# Altium PCB CLLC_PrimarySide_v13.PcbDoc (part 2 of 2)
Units mm, origin at the board's own origin, x right, y up, seen from the top; angles counter-clockwise.
Board outline 161.1 x 167.75 mm, 4 copper layers (GND, SIG, HVDC, GND/OUTPUT), stack 1.369 mm thick; 89 components, 34 nets, 222 pads, 484 vias.
Unrouted connection lines stored in the file: 15.
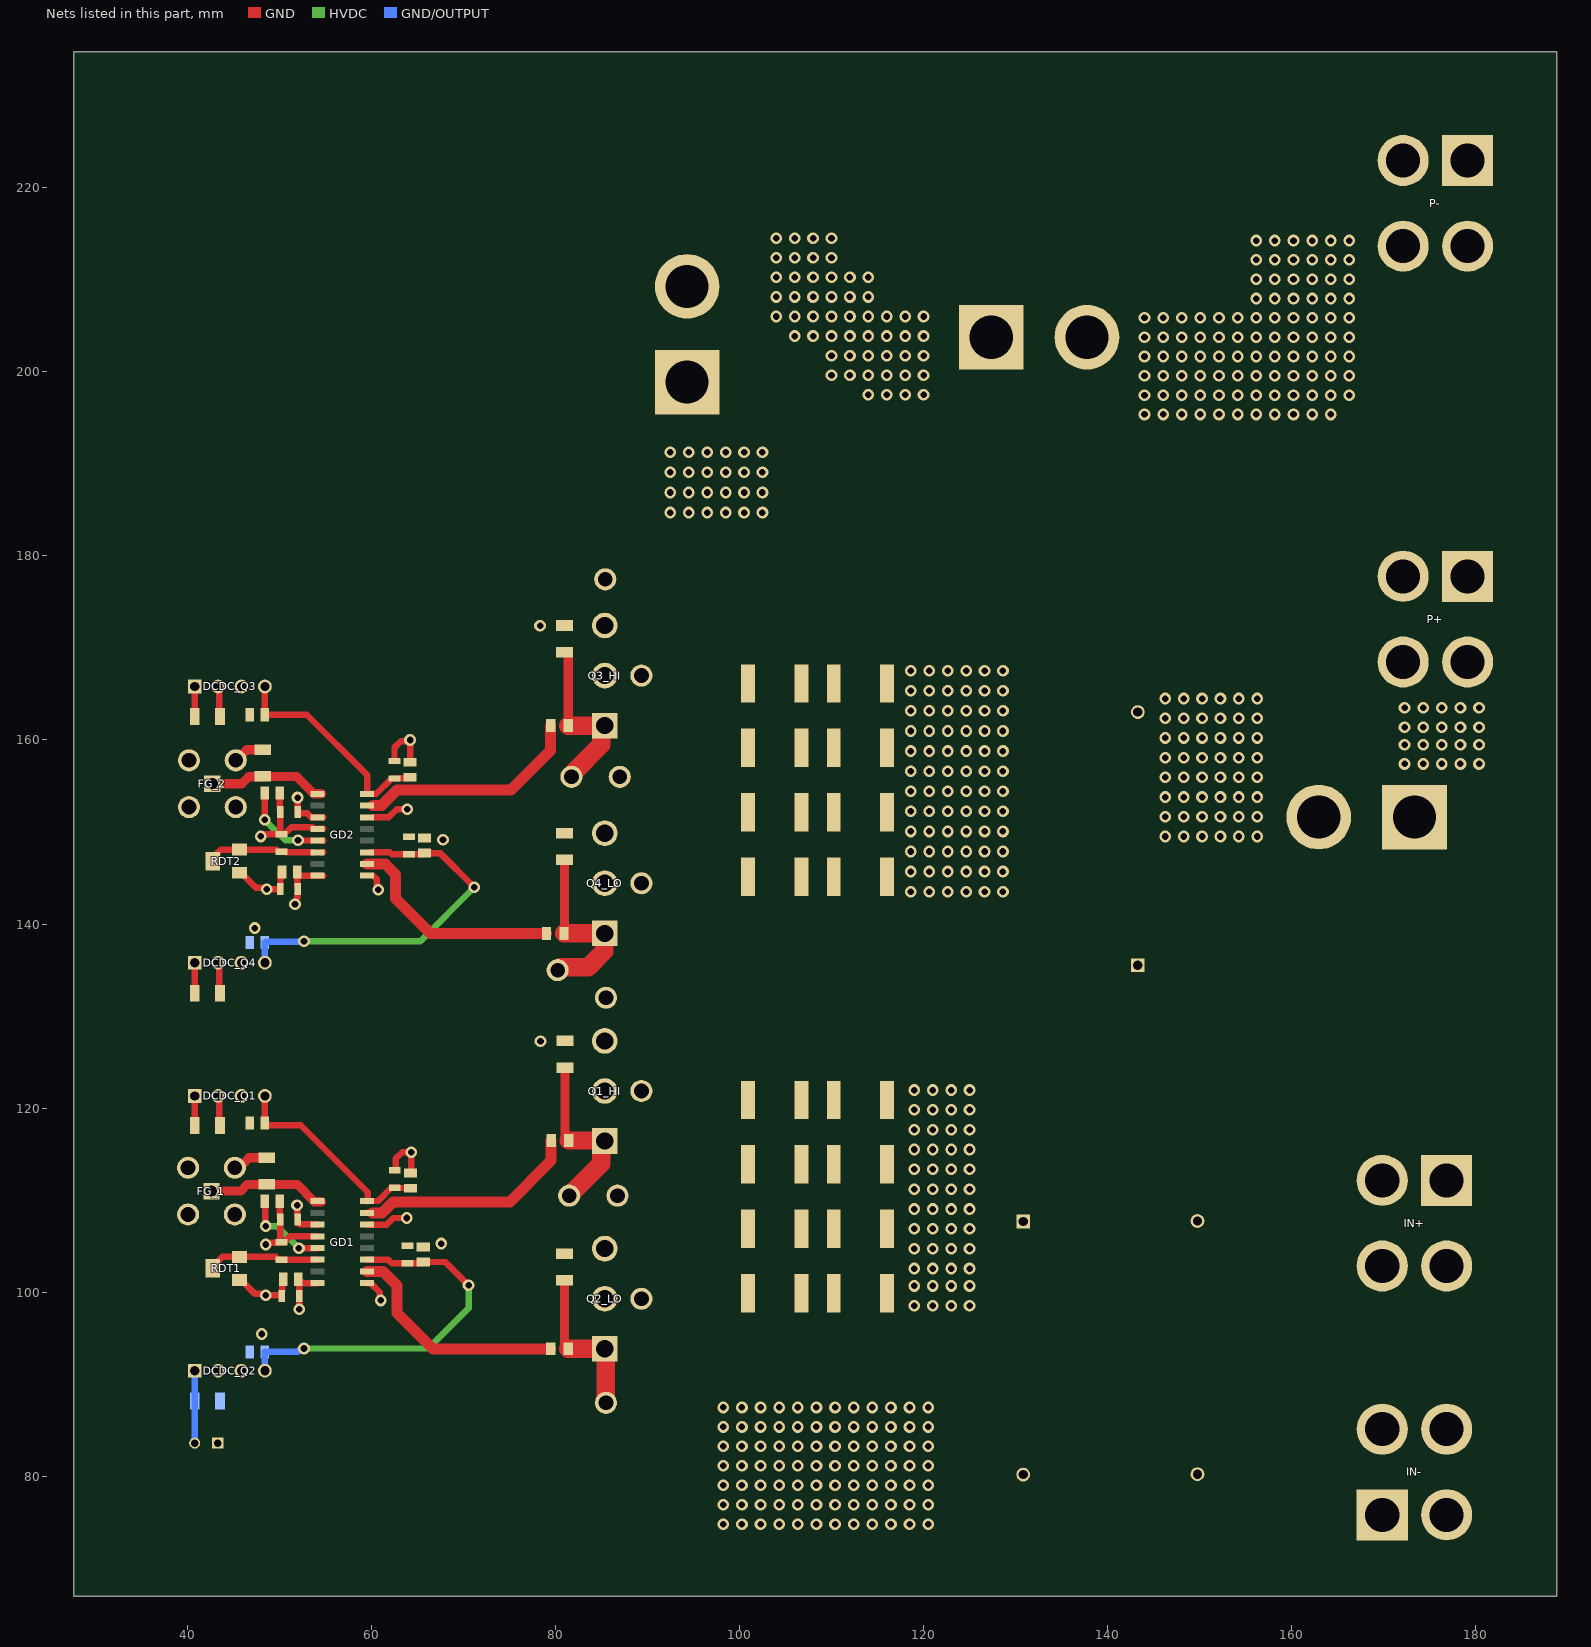
[diagram p4: the nets of this part, all layers, seen from the top]

## Via types
v1: diameter 1.27, hole 0.711, GND to GND/OUTPUT, 472 vias
v2: diameter 3, hole 3, GND to GND/OUTPUT, 8 vias
v3: diameter 4.5, hole 4.5, GND to GND/OUTPUT, 4 vias

## Nets (pads, with @x,y where several pads share a name; then routed paths per layer and width w, separated by ;. In a path a pad name is that pad's centre, name@x,y a point inside that pad or via, vN(x,y) a via of type N, cw(c..) or ccw(c..) an arc to the next point about the centre after c; other vN are vias at no path point)
NetC1_2: C1.2 C2.1
NetC3_2: C3.2 C4.1
NetC5_2: C5.2 C6.1
NetC7_2: C7.2 C8.1
NetC9_2: C9.2 C10.1
NetC11_2: C11.2 C12.1
NetC13_2: C13.2 C14.1
NetC15_2: C15.2 C16.1
NetC_r1_2: C_r1.2 Lr1.F1
  other v1: 146.25,149.518 148.25,149.518 150.25,149.518 152.25,149.518 154.25,149.518 156.25,149.518 146.25,151.659 148.25,151.659 150.25,151.659 152.25,151.659 154.25,151.659 156.25,151.659 146.25,153.799 148.25,153.799 150.25,153.799 152.25,153.799 154.25,153.799 156.25,153.799 146.25,155.939 148.25,155.939 150.25,155.939 152.25,155.939 154.25,155.939 156.25,155.939 146.25,158.079 148.25,158.079 150.25,158.079 152.25,158.079 154.25,158.079 156.25,158.079 146.25,160.22 148.25,160.22 150.25,160.22 152.25,160.22 154.25,160.22 156.25,160.22 146.25,162.36 148.25,162.36 150.25,162.36 152.25,162.36 154.25,162.36 156.25,162.36 146.25,164.5 148.25,164.5 150.25,164.5 152.25,164.5 154.25,164.5 156.25,164.5
NetCdc_Q1_in_1: Cdc_Q1_in.1 Cdc_Q2_in.1 Cdc_Q3_in.1 Cdc_Q4_in.1 Cgdi1_1_1.1 Cgdi1_1_2.1 Cgdi1_2_1.1 Cgdi1_2_2.1 Cgdi2_1_1.1 Cgdi2_1_2.1 Cgdi2_2_1.1 Cgdi2_2_2.1 DCDC_Q1.2 DCDC_Q2.2 DCDC_Q3.2 DCDC_Q4.2 GD1.3 GD1.5 GD1.8 GD2.3 GD2.5 GD2.8 VDD_DC.1 | length 49.3
  GND w0.7: DCDC_Q1.2@43.37,121.341 43.48,121.231 43.48,118.246 Cdc_Q1_in.1@43.59,118.136 ; DCDC_Q4.2@43.37,135.811 43.48,135.701 43.48,132.61 Cdc_Q4_in.1@43.59,132.5 ; DCDC_Q3.2@43.37,165.814 43.48,165.704 43.48,162.665 Cdc_Q3_in.1@43.59,162.555 ; Cgdi1_1_1.1@48.43,109.9 48.49,109.84 48.49,107.26 v1(48.55,107.2) ; Cgdi2_1_1.1@48.43,154.25 48.435,154.245 48.435,151.325 v1(48.44,151.32) ; v1(51.725,142.15) 51.834,142.259 51.834,142.662 51.95,142.778 51.95,143.245 52,143.295 52,144.1 51.977,144.123 51.977,145.622 Cgdi2_2_1.1@51.954,145.645 ; v1(51.95,109.45) 51.975,109.425 51.975,108.43 52,108.405 Cgdi1_1_2.1@52,107.9 ; Cgdi2_2_1.1@51.977,145.402 51.977,145.377 52.074,145.28 52.459,145.28 52.484,145.255 GD2.8@54.813,145.255 ; Cgdi1_1_2.1@52,107.6 52.215,107.385 54.131,107.385 GD1.3@54.156,107.36 ; v1(52,153.75) 52,153.487 52,152.705 52,152.058 53.044,152.058 53.472,151.63 54.131,151.63 GD2.3@54.156,151.605 GD2.3@54.813,151.605 ; v1@52.068,149.082 GD2.5@53.756,149.082 ; Cgdi1_2_1.1@52.07,101.429 52.173,101.326 52.173,99.844 52.182,99.835 52.182,98.157 v1(52.175,98.15) ; v1(52.15,104.8) 52.16,104.81 54.146,104.81 GD1.5@54.156,104.82 ; Cgdi1_2_1.1@52.173,101.174 52.173,101.081 52.19,101.064 52.546,101.064 52.6,101.01 GD1.8@54.156,101.01 ; GD2.5@54.556,149.065 GD2.5@54.813,149.065
  HVDC w0.7: v1(48.44,151.32) 50.66,149.1 v1(52.05,149.1) ; v1(48.55,107.2) 48.559,107.191 49.759,107.191 v1(52.15,104.8)
NetCdc_Q1_in_2: Cdc_Q1_in.2 Cdc_Q2_in.2 Cdc_Q3_in.2 Cdc_Q4_in.2 CDT1.2 CDT2.2 Cgdi1_1_1.2 Cgdi1_1_2.2 Cgdi1_2_1.2 Cgdi1_2_2.2 Cgdi2_1_1.2 Cgdi2_1_2.2 Cgdi2_2_1.2 Cgdi2_2_2.2 DCDC_Q1.1 DCDC_Q2.1 DCDC_Q3.1 DCDC_Q4.1 FG_1.2 FG_1.3 FG_1.4 FG_1.5 FG_2.2 FG_2.3 FG_2.4 FG_2.5 GD1.4 GD2.4 R_pulldown_1.2 R_pulldown_2.2 RDT1.1 RDT2.1 VDD_DC.2 | length 61
  GND w0.7: Cdc_Q1_in.2@40.83,118.136 DCDC_Q1.1@40.83,121.341 ; Cdc_Q4_in.2@40.83,132.5 DCDC_Q4.1@40.83,135.811 ; Cdc_Q3_in.2@40.83,162.555 DCDC_Q3.1@40.83,165.814 ; FG_1.5@45.19,113.54 FG_1.5@45.65,113.54 ; FG_2.5@45.29,157.79 FG_2.5@45.325,157.79 ; RDT1.1@45.7,101.364 45.85,101.364 47.386,99.828 48.268,99.828 48.396,99.7 49.897,99.7 49.933,99.664 50.29,99.664 Cgdi1_2_2.2@50.29,99.607 50.29,100.112 50.34,100.162 50.34,101.339 Cgdi1_2_1.2@50.43,101.429 ; RDT2.1@45.7,145.58 45.85,145.58 47.502,143.928 48.368,143.928 48.496,143.8 Cgdi2_2_2.2@50.1,143.8 50.1,144.305 50.15,144.355 50.15,144.87 50.194,144.914 50.194,145.525 Cgdi2_2_1.2@50.314,145.645 ; v1(48,149.525) 48.154,149.525 48.379,149.75 CDT2.2@50.25,149.75 ; v1(48.55,105.2) 48.659,105.309 49.062,105.309 49.153,105.4 CDT1.2@49.9,105.4 ; Cgdi1_1_1.2@50.07,109.9 50.085,109.885 50.085,108.215 50.1,108.2 50.1,105.45 50.55,105.45 51.19,106.09 GD1.4@54.156,106.09 ; Cgdi2_1_1.2@50.085,154.235 50.085,152.515 50.1,152.5 CDT2.2@50.1,149.75 ; CDT2.2@50.55,149.75 51.3,150.5 53.616,150.5 53.756,150.36 54.131,150.36 GD2.4@54.156,150.335 GD2.4@54.813,150.335
  GND w1: FG_2.5@45.325,157.79 46.485,158.95 R_pulldown_2.2@48.225,158.95 ; FG_1.5@45.65,113.54 46.735,114.625 R_pulldown_1.2@48.65,114.625
  GND/OUTPUT w0.7: VDD_DC.2@40.83,83.62 DCDC_Q2.1@40.83,91.491
  other v1: 48.55,99.7 48.65,143.8
NetCdc_Q1_out_1: Cdc_Q1_out.1 Cgda1_1.1 Cgda1_2.1 DCDC_Q1.4 GD1.16 | length 23.7
  GND w0.7: DCDC_Q1.4@48.45,121.341 48.45,118.141 52.359,118.141 59.61,110.89 59.61,109.925 GD1.16@59.581,109.925 ; GD1.16@59.556,109.9 GD1.16@59.581,109.925 ; Cgda1_1.1@64.257,111.32 64.242,111.335 62.872,111.335 62.857,111.35 62.175,111.35 60.75,109.925 GD1.16@59.581,109.925
NetCdc_Q2_out_1: Cdc_Q2_out.1 Cgdb1_1.1 Cgdb1_2.1 DCDC_Q2.4 GD1.11 | length 40.9
  GND w0.7: GD1.11@59.556,103.55 59.581,103.525 61.875,103.525 62.225,103.175 Cgdb1_2.1@63.95,103.175 65.53,103.175 Cgdb1_1.1@65.65,103.295 68.055,103.295 v1(70.575,100.775)
  HVDC w0.7: v1(52.7,93.9) 66.2,93.9 70.575,98.275 v1(70.575,100.775)
  GND/OUTPUT w0.7: DCDC_Q2.4@48.45,91.491 Cdc_Q2_out.1@48.45,93.525 52.005,93.525 52.271,93.791 52.591,93.791 v1(52.7,93.9)
NetCdc_Q3_out_1: Cdc_Q3_out.1 Cgda2_1.1 Cgda2_2.1 DCDC_Q3.4 GD2.16 | length 23.8
  GND w0.7: DCDC_Q3.4@48.45,165.814 Cdc_Q3_out.1@48.45,162.75 53,162.75 59.556,156.194 GD2.16@59.556,154.145 ; GD2.16@60.097,154.145 60.557,154.145 62.232,155.82 63.037,155.82 63.063,155.845 64.132,155.845 Cgda2_1.1@64.232,155.945
NetCdc_Q4_out_1: Cdc_Q4_out.1 Cgdb2_1.1 Cgdb2_2.1 DCDC_Q4.4 GD2.11 | length 40.2
  GND w0.7: GD2.11@59.956,147.795 62.027,147.795 62.232,147.59 Cgdb2_2.1@64.107,147.59 ; Cgdb2_2.1@64.407,147.59 64.417,147.6 65.687,147.6 Cgdb2_1.1@65.927,147.84 ; Cgdb2_1.1@65.807,147.72 67.48,147.72 v1(71.2,144)
  HVDC w0.7: v1(52.7,138.15) 65.35,138.15 v1(71.2,144)
  GND/OUTPUT w0.7: DCDC_Q4.4@48.45,135.811 Cdc_Q4_out.1@48.45,138.011 48.52,138.08 52.655,138.08 v1@52.725,138.15
NetCDT1_1: CDT1.1 GD1.6 RDT1.2 RDT1.3 | length 12.1
  GND w0.7: RDT1.2@42.8,102.614 42.8,102.814 43.85,103.864 49.636,103.864 49.95,103.55 GD1.6@54.156,103.55
NetCDT2_1: CDT2.1 GD2.6 RDT2.2 RDT2.3 | length 11.7
  GND w0.7: RDT2.2@42.8,147.2 42.97,147.2 43.25,147.48 43.25,147.67 43.66,148.08 49.72,148.08 49.95,147.85 CDT2.1@50.2,147.85 ; CDT2.1@50.28,147.85 50.755,147.85 50.785,147.82 GD2.6@53.756,147.82 ; GD2.6@54.556,147.795 GD2.6@54.813,147.795
NetFG_1_1: FG_1.1 GD1.1 R_pulldown_1.1 | length 13
  GND w1: FG_1.1@42.65,111 45.825,111 46.55,111.725 R_pulldown_1.1@48.65,111.725 51.956,111.725 53.831,109.85 GD1.1@54.575,109.85
NetFG_2_1: FG_2.1 GD2.1 R_pulldown_2.1 | length 12.9
  GND w0.7: R_pulldown_2.1@48.187,156.012 R_pulldown_2.1@48.225,156.05
  GND w1: FG_2.1@42.75,155.25 45.941,155.25 46.703,156.012 R_pulldown_2.1@48.187,156.012 ; R_pulldown_2.1@48.225,156.05 51.876,156.05 53.776,154.15 GD2.1@54.575,154.15
NetGD1_10: GD1.10 RgB_1.1 | length 25.2
  GND w1.2: GD1.10@59.556,102.28 61.295,102.28 62.825,100.75 62.825,97.775 66.73,93.87 RgB_1.1@79.5,93.87
NetGD1_15: GD1.15 RgA_1.1 | length 24.5
  GND w0.7: GD1.15@59.556,108.63 GD1.15@60.17,108.63
  GND w1.2: GD1.15@60.17,108.63 61.18,108.63 62.375,109.825 75.075,109.825 79.55,114.3 RgA_1.1@79.55,116.5
NetGD2_10: GD2.10 RgB_2.1 | length 24.1
  GND w1.2: GD2.10@59.556,146.525 61.525,146.525 62.65,145.4 62.65,142.8 66.456,138.994 67.744,138.994 RgB_2.1@79.05,138.994
NetGD2_15: GD2.15 RgA_2.1 | length 24.5
  GND w1.2: GD2.15@60.213,152.875 61.1,152.875 62.8,154.575 75.194,154.575 79.5,158.881 RgA_2.1@79.5,161.557
NetLr1_S1: Lr1.S1 P+.1 P+.2 P+.3 P+.4
  other v1: 172.25,157.401 174.273,157.401 176.295,157.401 178.318,157.401 180.341,157.401 172.25,159.5 174.273,159.5 176.295,159.5 178.318,159.5 180.341,159.5 172.25,161.401 174.273,161.401 176.295,161.401 178.318,161.401 180.341,161.401 172.25,163.5 174.273,163.5 176.295,163.5 178.318,163.5 180.341,163.5
NetLr2_F1: Lr2.F1 Lr3.S1
  other v1: 114,197.5 116,197.5 118,197.5 120,197.5 110,199.625 112,199.625 114,199.625 116,199.625 118,199.625 120,199.625 110,201.75 112,201.75 114,201.75 116,201.75 118,201.75 120,201.75 106,203.875 108,203.875 110,203.875 112,203.875 114,203.875 116,203.875 118,203.875 120,203.875 104,206 106,206 108,206 110,206 112,206 114,206 116,206 118,206 120,206 104,208.125 106,208.125 108,208.125 110,208.125 112,208.125 114,208.125 104,210.25 106,210.25 108,210.25 110,210.25 112,210.25 114,210.25 104,212.375 106,212.375 108,212.375 110,212.375 104,214.5 106,214.5 108,214.5 110,214.5
NetLr3_F1: Lr3.F1 P-.1 P-.2 P-.3 P-.4
  other v1: 144,195.36 146.023,195.36 148.045,195.36 150.068,195.36 152.091,195.36 154.114,195.36 156.136,195.36 158.159,195.36 160.182,195.36 162.205,195.36 164.227,195.36 144,197.459 146.023,197.459 148.045,197.459 150.068,197.459 152.091,197.459 154.114,197.459 156.136,197.459 158.159,197.459 160.182,197.459 162.205,197.459 164.227,197.459 166.25,197.459 144,199.558 146.023,199.558 148.045,199.558 150.068,199.558 152.091,199.558 154.114,199.558 156.136,199.558 158.159,199.558 160.182,199.558 162.205,199.558 164.227,199.558 166.25,199.558 144,201.657 146.023,201.657 148.045,201.657 150.068,201.657 152.091,201.657 154.114,201.657 156.136,201.657 158.159,201.657 160.182,201.657 162.205,201.657 164.227,201.657 166.25,201.657 144,203.755 146.023,203.755 148.045,203.755 150.068,203.755 152.091,203.755 154.114,203.755 156.136,203.755 158.159,203.755 160.182,203.755 162.205,203.755 164.227,203.755 166.25,203.755 144,205.854 146.023,205.854 148.045,205.854 150.068,205.854 152.091,205.854 154.114,205.854 156.136,205.854 158.159,205.854 160.182,205.854 162.205,205.854 164.227,205.854 166.25,205.854 156.136,207.953 158.159,207.953 160.182,207.953 162.205,207.953 164.227,207.953 166.25,207.953 156.136,210.052 158.159,210.052 160.182,210.052 162.205,210.052 164.227,210.052 166.25,210.052 156.136,212.151 158.159,212.151 160.182,212.151 162.205,212.151 164.227,212.151 166.25,212.151 156.136,214.25 158.159,214.25 160.182,214.25 162.205,214.25 164.227,214.25 166.25,214.25
Q1_D: C1.1 C3.1 C5.1 C7.1 C9.1 C11.1 C13.1 C15.1 C_in_1.1 C_in_2.1 IN+.1 IN+.2 IN+.3 IN+.4 Q1_D.1 Q1_HI.2 Q3_D.1 Q3_HI.2
  other v1: 119,98.547 121,98.547 123,98.547 125,98.547 119,100.7 121,100.7 123,100.7 125,100.7 119,102.586 121,102.586 123,102.586 125,102.586 119,104.74 121,104.74 123,104.74 125,104.74 119,106.893 121,106.893 123,106.893 125,106.893 119,109.047 121,109.047 123,109.047 125,109.047 119,111.2 121,111.2 123,111.2 125,111.2 119,113.365 121,113.365 123,113.365 125,113.365 119,115.518 121,115.518 123,115.518 125,115.518 119,117.672 121,117.672 123,117.672 125,117.672 119,119.825 121,119.825 123,119.825 125,119.825 119,121.978 121,121.978 123,121.978 125,121.978 118.625,143.525 120.625,143.525 122.625,143.525 124.625,143.525 126.625,143.525 128.625,143.525 118.625,145.707 120.625,145.707 122.625,145.707 124.625,145.707 126.625,145.707 128.625,145.707 118.625,147.889 120.625,147.889 122.625,147.889 124.625,147.889 126.625,147.889 128.625,147.889 118.625,150.07 120.625,150.07 122.625,150.07 124.625,150.07 126.625,150.07 128.625,150.07 118.625,152.252 120.625,152.252 122.625,152.252 124.625,152.252 126.625,152.252 128.625,152.252 118.625,154.434 120.625,154.434 122.625,154.434 124.625,154.434 126.625,154.434 128.625,154.434 118.625,156.616 120.625,156.616 122.625,156.616 124.625,156.616 126.625,156.616 128.625,156.616 118.625,158.798 120.625,158.798 122.625,158.798 124.625,158.798 126.625,158.798 128.625,158.798 118.625,160.98 120.625,160.98 122.625,160.98 124.625,160.98 126.625,160.98 128.625,160.98 118.625,163.161 120.625,163.161 122.625,163.161 124.625,163.161 126.625,163.161 128.625,163.161 118.625,165.343 120.625,165.343 122.625,165.343 124.625,165.343 126.625,165.343 128.625,165.343 118.625,167.525 120.625,167.525 122.625,167.525 124.625,167.525 126.625,167.525 128.625,167.525
Q1_G: Q1_G.1 Q1_HI.1 RgA_1.2 RgsA_1.1 | length 19.6
  GND w0.7: Q1_HI.1@85.305,116.5 Q1_HI.1@85.373,116.432
  GND w1: RgsA_1.1@81.05,124.412 81.05,117.1 81.45,116.7 RgA_1.2@81.45,116.5
  GND w2: RgA_1.2@81.45,116.5 Q1_HI.1@85.305,116.5 ; Q1_G.1@81.5,110.5 84.978,113.978 84.978,116.037 Q1_HI.1@85.373,116.432
Q1_S: C_r1.1 Cdc_Q1_out.2 Cgda1_1.2 Cgda1_2.2 DCDC_Q1.3 GD1.14 Q1_HI.3 Q1_S.1 Q2_D.1 Q2_LO.2 RgsA_1.2 | length 10.1
  GND w0.7: GD1.14@59.556,107.36 61.671,107.36 62.386,108.075 v1(63.85,108.075) ; Cgda1_2.2@62.65,113.25 62.65,114.5 63.375,115.225 v1(64.35,115.225) Cgda1_1.2@64.35,112.96
  other v1: 78.389,127.29
Q2_G: Q2_G.1 Q2_LO.1 RgB_1.2 RgsB_1.1 | length 17.5
  GND w0.7: Q2_LO.1@85.373,93.87 Q2_LO.1@85.5,93.743
  GND w1: RgsB_1.1@81,101.3 81,94.47 81.4,94.07 RgB_1.2@81.4,93.87
  GND w2: RgB_1.2@81.4,93.87 Q2_LO.1@85.373,93.87 ; Q2_G.1@85.5,88 Q2_LO.1@85.5,93.743
Q2_S: C2.2 C4.2 C6.2 C8.2 C10.2 C12.2 C14.2 C16.2 C_in_1.2 C_in_2.2 Cdc_Q2_out.2 Cdc_Q4_out.2 Cgdb1_1.2 Cgdb1_2.2 Cgdb2_1.2 Cgdb2_2.2 DCDC_Q2.3 DCDC_Q4.3 GD1.9 GD2.9 IN-.1 IN-.2 IN-.3 IN-.4 Q2_LO.3 Q2_S.1 Q4_LO.3 Q4_S.1 RgsB_1.2 RgsB_2.2 | length 4.5
  GND w0.7: GD1.9@59.556,101.01 59.931,101.01 60.941,100 60.941,99.234 v1(61.05,99.125) ; GD2.9@60.213,145.255 60.622,144.846 60.622,144.256 60.641,144.237 60.641,143.834 v1(60.75,143.725)
  other v1: 98.25,74.807 100.273,74.807 102.295,74.807 104.318,74.807 106.341,74.807 108.364,74.807 110.386,74.807 112.409,74.807 114.432,74.807 116.455,74.807 118.477,74.807 120.5,74.807 98.25,76.922 100.273,76.922 102.295,76.922 104.318,76.922 106.341,76.922 108.364,76.922 110.386,76.922 112.409,76.922 114.432,76.922 116.455,76.922 118.477,76.922 120.5,76.922 98.25,79.038 100.273,79.038 102.295,79.038 104.318,79.038 106.341,79.038 108.364,79.038 110.386,79.038 112.409,79.038 114.432,79.038 116.455,79.038 118.477,79.038 120.5,79.038 98.25,81.153 100.273,81.153 102.295,81.153 104.318,81.153 106.341,81.153 108.364,81.153 110.386,81.153 112.409,81.153 114.432,81.153 116.455,81.153 118.477,81.153 120.5,81.153 98.25,83.269 100.273,83.269 102.295,83.269 104.318,83.269 106.341,83.269 108.364,83.269 110.386,83.269 112.409,83.269 114.432,83.269 116.455,83.269 118.477,83.269 120.5,83.269 98.25,85.384 100.273,85.384 102.295,85.384 104.318,85.384 106.341,85.384 108.364,85.384 110.386,85.384 112.409,85.384 114.432,85.384 116.455,85.384 118.477,85.384 120.5,85.384 98.25,87.5 100.273,87.5 102.295,87.5 104.318,87.5 106.341,87.5 108.364,87.5 110.386,87.5 112.409,87.5 114.432,87.5 116.455,87.5 118.477,87.5 120.5,87.5 48.125,95.475 67.6,105.3 47.35,139.575 67.8,149.15
Q3_G: Q3_G.1 Q3_HI.1 RgA_2.2 RgsA_2.1 | length 19.3
  GND w0.7: RgsA_2.1@81,169.537 81.175,169.537 81.4,169.312 RgsA_2.1@81.4,169.262 ; Q3_HI.1@85.363,161.547 Q3_HI.1@85.373,161.557
  GND w1: RgA_2.2@81.4,161.557 RgsA_2.1@81.4,169.262
  GND w2: RgA_2.2@81.4,161.557 Q3_HI.1@85.373,161.557 ; Q3_G.1@81.75,156 81.75,156.108 81.95,156.308 81.95,156.45 84.978,159.478 84.978,161.162 Q3_HI.1@85.363,161.547
Q3_S: Cdc_Q3_out.2 Cgda2_1.2 Cgda2_2.2 DCDC_Q3.3 GD2.14 Lr2.S1 Q3_HI.3 Q3_S.1 Q4_D.1 Q4_LO.2 RgsA_2.2 | length 10
  GND w0.7: GD2.14@60.213,151.605 61.89,151.605 62.76,152.475 v1(63.925,152.475) ; Cgda2_2.2@62.532,157.715 62.532,159.193 63.212,159.872 63.943,159.872 64.071,160 v1(64.225,160) 64.229,159.996 64.229,157.589 Cgda2_1.2@64.232,157.585
  other v1: 78.339,172.414 92.5,184.705 94.5,184.705 96.5,184.705 98.5,184.705 100.5,184.705 102.5,184.705 92.5,186.886 94.5,186.886 96.5,186.886 98.5,186.886 100.5,186.886 102.5,186.886 92.5,189.068 94.5,189.068 96.5,189.068 98.5,189.068 100.5,189.068 102.5,189.068 92.5,191.25 94.5,191.25 96.5,191.25 98.5,191.25 100.5,191.25 102.5,191.25
Q4_G: Q4_G.1 Q4_LO.1 RgB_2.2 RgsB_2.1 | length 20.1
  GND w0.7: Q4_G.1@80.25,135 Q4_G.1@80.571,135.321 ; Q4_LO.1@85.301,138.922 Q4_LO.1@85.373,138.994
  GND w1: RgB_2.2@81,138.994 RgsB_2.1@81,146.8
  GND w2: Q4_G.1@80.571,135.321 83.571,135.321 85.301,137.051 Q4_LO.1@85.301,138.922 ; RgB_2.2@80.95,138.994 Q4_LO.1@85.373,138.994
pads on no net: GD1.2 GD1.7 GD1.12 GD1.13 GD2.2 GD2.7 GD2.12 GD2.13
copper on no net:
  other v2: 112.225,69.65 31.25,70.125 185.425,70.125 31.25,151.7 185.425,151.7 31.25,230.325 112.225,230.325 185.425,230.325
  other v3: 66.273,99.31 66.273,121.872 66.273,144.434 66.273,166.997

## Polygon pours and split planes (outlines as drawn)
Q3_S on GND/OUTPUT "GND/OUTPUT-Q3_S" (solid, pour order 193): 53.525,161.7 46.55,161.7 45.25,163 45.25,167.75 48.675,171.175 73.025,171.175 79.25,177.4 82.15,177.4 83.825,179.075 89.075,179.075 90.025,180.025 90.025,202.225 91.55,203.75 101.25,203.75 105.25,199.75 105.25,185.126 99.85,179.726 99.85,174.85 99.85,150.95 90.524,141.624 83.75,141.624 82.75,142.624 82.75,144.624 84.25,146.124 86.75,146.124 89.763,149.137 89.725,149.175 89.725,163.407 91.725,165.35 91.725,168.525 89.876,170.374 84.849,170.374 73.975,159.5 73.975,152.7 73,151.725 63.5,151.725
Q2_S on GND/OUTPUT "Q2_S_L04_P198" (solid, pour order 198): 44.9,135.32 45.3,134.92 46.375,134.92 47.25,135.795 47.25,138.595 47.85,139.195 48.5,139.195 48.975,139.67 48.975,140.495 48.825,140.645 47.2,140.645 44.9,138.345
Q1_S on GND/OUTPUT "GND/OUTPUT-Q1_S" (solid, pour order 192): 84.5,125.25 73.75,114.5 73.75,108.15 73.1,107.5 63.5,107.5 60,111 53.5,117.5 46.25,117.5 45.25,118.5 45.25,124.75 47.95,127.45 75.55,127.45 80.1,132 82.875,132 84.4,133.525 88.775,133.525 95.4,140.15 144.85,140.15 149.95,135.05 149.95,127.45 148.5,126 103.05,126 99,121.95 99,104.5 91,96.5 83.75,96.5 82.75,97.5 82.75,99.5 84.25,101 86.75,101 89.5,103.75 89.5,117.65 92,120.15 92,123.1 89.85,125.25
Q2_S on GND/OUTPUT "Q2_S_L04_P174" (solid, pour order 174): 44.9,91 45.3,90.6 46.375,90.6 47.25,91.475 47.25,94.275 47.85,94.875 48.5,94.875 48.975,95.35 48.975,96.175 48.825,96.325 47.2,96.325 44.9,94.025
NetCdc_Q1_in_1 on GND/OUTPUT "GND/OUTPUT-NetCdc_Q1_in_1" (solid, pour order 170): 42,82.5 42.5,82 44,82 44.5,82.5 44.5,95 46.5,97 52.75,97 56,100.25 56,110.75 50.25,116.5 46.25,116.5 44.625,118.125 44.625,139.445 46.18,141 52.43,141 56,144.57 56,155 50.18,160.82 46.25,160.82 44.75,162.32 44.75,166.82 44,167.57 42.5,167.57 42,167.07 42,161.57 44.25,159.32 46.75,159.32 50.75,155.32 50.75,143.32 50.18,142.75 44.43,142.75 42,140.32 42,120.337 42,117.25 44.25,115 48,115 50.75,112.25 50.75,99.5 50,98.75 44.75,98.75 42,96
NetLr2_F1 on GND/OUTPUT "NETLR2_F1_L04_P154" (solid, pour order 154): 130.975,207.25 130,208.225 130,208.25 118.25,208.25 110.25,216.25 92.75,216.25 89.75,213.25 89.75,207.75 92.25,205.25 102.772,205.25 113.022,194 129,194 130.975,195.975
NetC_r1_2 on GND/OUTPUT "NETC_R1_2_L04_P150" (solid, pour order 150): 142.603,167.103 138,162.5 138,152.75 143.5,147.25 164.5,147.25 166.9,149.65 166.9,157.1 156.897,167.103
NetLr1_S1 on GND/OUTPUT "NETLR1_S1_L04_P147" (solid, pour order 147): 169.75,154 169.75,148.125 179.125,148.125 183,152 183,181.75 179.5,185.25 166.75,185.25 160,178.5 160,169.5 169.75,159.75
NetLr3_F1 on GND/OUTPUT "NETLR3_F1_L04_P146" (solid, pour order 146): 165,227.75 152.25,215 152.25,209.75 150.5,208 136.25,208 133.75,205.5 133.75,197.75 139.25,192.25 168.25,192.25 184.25,208.25 184.25,226 181.75,228.5 165.75,228.5
NetCdc_Q1_in_2 on SIG "NETCDC_Q1_IN_2_L02_P172" (solid, pour order 172): 37.75,170.95 38.775,172 44,172 44.75,171.25 44.75,162.3 46.225,160.825 50.175,160.825 56,155 56,144.575 52.425,141 46.175,141 44.75,139.575 44.75,118 46.25,116.5 50.25,116.5 56,110.75 56,100.25 52.75,97 46.5,97 44.575,95.075 44.575,82.35 43.725,81.5 40.5,81.5 37.75,84.25
Q2_S on SIG "Q2_S_L02_P197" (solid, pour order 197): 45.25,138.75 46.75,140.25 56.25,140.25 67.25,151.25 87.125,151.25 87.95,150.425 87.95,148.424 86.85,147.324 84.299,147.324 70.999,134.024 46.226,134.024 45.25,135
Q2_S on SIG "Q2_S_L02_P173" (solid, pour order 173): 45.25,89.75 45.25,94.75 46.825,96.325 56.075,96.325 66.4,106.65 86.601,106.65 87.95,105.301 87.95,103.3 86.85,102.2 83.875,102.2 70.575,88.9 46.1,88.9
Q2_S on SIG "GND-Q2_S" (solid, pour order 179): 87.75,93 91.75,97 100.5,97 107,90.5 130.25,90.5 136.25,96.5 136.25,114.25 143.35,121.35 181.025,121.35 185.1,117.275 185.1,78.1 179,72 92.75,72 87.75,77
Q2_S on GND "GND-Q2_S" (solid, pour order 196): 63.807,150.307 64.982,150.307 65.9,151.25 81.375,151.25 82.875,152.75 83.825,153.7 83.825,154.625 86.45,157.25 89.975,157.25 91.5,158.775 91.5,165.357 92.025,165.882 92.025,168.225 91.5,168.75 91.5,175.25 94.75,178.5 102.25,178.5 104.767,175.983 104.767,97.733 112,90.5 135.25,90.5 141.25,96.5 141.25,114.25 148.35,121.35 181.175,121.35 185.15,117.375 185.15,78.15 179,72 97.75,72 91.7,78.05 91.7,96.9 92.075,97.3 92.075,100.75 92.1,100.775 90.125,102.75 90.125,102.875 89.601,102.875 89.6,102.876 80.424,102.876 78.85,104.45 63.05,104.45 62.5,105 62.5,105.375 62.9,105.775 65.525,105.775 66.4,106.65 82.474,106.65 83.45,107.626 84.75,108.925 84.75,110.475 86.7,112.425 89.55,112.425 91.95,114.825 91.95,145.575 89.525,148 82.887,148 82.875,148.012 76.363,148.012 75.875,148.5 63.647,148.5 63.226,148.922 63.226,148.927 63.235,149.735
Q3_S on GND "Q3_S_L01_P194" (solid, pour order 194): 45.15,167.3 45.15,164.575 45.175,164.575 46.3,163.45 46.3,161.925 47.375,161.925 47.375,164.975 46.725,165.625 46.725,166.9 46.225,167.4 46.225,167.425 45.275,167.425
Q1_S on GND "Q1_S_L01_P195" (solid, pour order 195): 45.15,122.827 45.15,120.102 45.175,120.102 46.3,118.977 46.3,117.452 47.275,117.452 47.275,120.602 46.725,121.152 46.725,122.427 46.225,122.927 46.225,122.952 45.275,122.952
Q3_S on GND "Q3_S_L01_P129" (solid, pour order 129): 77.25,174.25 77.75,174.75 87.25,174.75 87.75,174.25 87.75,171.25 87.25,170.75 77.75,170.75 77.25,171.25
NetC9_2 on GND "NETC9_2_L01_P162" (solid, pour order 162): 106,102.01 106.25,102.26 110.75,102.26 111,102.01 111,97.76 110.75,97.51 106.25,97.51 106,97.76
NetC15_2 on GND "NETC15_2_L01_P161" (solid, pour order 161): 106,109.01 106.25,109.26 110.75,109.26 111,109.01 111,104.76 110.75,104.51 106.25,104.51 106,104.76
NetC13_2 on GND "NETC13_2_L01_P160" (solid, pour order 160): 106,116.01 106.25,116.26 110.75,116.26 111,116.01 111,111.76 110.75,111.51 106.25,111.51 106,111.76
NetC11_2 on GND "NETC11_2_L01_P159" (solid, pour order 159): 106,123.01 106.25,123.26 110.75,123.26 111,123.01 111,118.76 110.75,118.51 106.25,118.51 106,118.76
NetC1_2 on GND "NETC1_2_L01_P158" (solid, pour order 158): 106,147.25 106.25,147.5 110.75,147.5 111,147.25 111,143 110.75,142.75 106.25,142.75 106,143
NetC3_2 on GND "NETC3_2_L01_P157" (solid, pour order 157): 106,154.25 106.25,154.5 110.75,154.5 111,154.25 111,150 110.75,149.75 106.25,149.75 106,150
NetC5_2 on GND "NETC5_2_L01_P156" (solid, pour order 156): 106,161.25 106.25,161.5 110.75,161.5 111,161.25 111,157 110.75,156.75 106.25,156.75 106,157
NetC7_2 on GND "NETC7_2_L01_P155" (solid, pour order 155): 106,168.25 106.25,168.5 110.75,168.5 111,168.25 111,164 110.75,163.75 106.25,163.75 106,164
Q1_S on GND "Q1_S_L01_P130" (solid, pour order 130): 77.25,129.126 77.75,129.626 87.25,129.626 87.75,129.126 87.75,126.126 87.25,125.626 77.75,125.626 77.25,126.126
Q1_D on GND "Q1_D_L01_P102" (solid, pour order 102): 131.925,175.725 133.9,173.75 133.9,98.925 131.475,96.5 114.575,96.5 112.75,98.325 112.75,174.475 114,175.725
Q1_D on HVDC "HVDC-Q1_D" (solid, pour order 108): 107.75,116.7 111.7,112.75 112.025,112.425 112.025,99.1 114.625,96.5 180.5,96.5 183.475,99.475 183.475,115.7 178.8,120.375 136.375,120.375 133.9,122.85 133.9,173.75 131.9,175.75 113.975,175.75 112.025,173.8 108.975,170.75 87.75,170.75 84.375,167.375 84.375,166.625 88.6,162.4 109.6,162.4 112.025,160 112.025,129 108,125 87.75,125 84.375,121.625 89.3,116.7
NetLr2_F1 on HVDC "NETLR2_F1_L03_P145" (solid, pour order 145): 130.975,207.275 130,208.25 118.25,208.25 110.25,216.25 92.75,216.25 89.75,213.25 89.75,207.75 92.25,205.25 102.772,205.25 113.022,194 129,194 130.975,195.975
NetLr3_F1 on HVDC "NETLR3_F1_L03_P152" (solid, pour order 152): 165,227.75 152.25,215 152.25,209.75 150.5,208 136.25,208 133.75,205.5 133.75,197.75 139.25,192.25 168.25,192.25 184.25,208.25 184.25,226 181.75,228.5 165.75,228.5
Q3_S on HVDC "Q3_S_L03_P163" (solid, pour order 163): 100,178.25 91,178.25 90,179.25 90,202.25 91.5,203.75 101.25,203.75 105.25,199.75 105.25,183.5
NetLr1_S1 on HVDC "NETLR1_S1_L03_P151" (solid, pour order 151): 169.75,154 169.75,148.125 179.125,148.125 183,152 183,181.75 179.5,185.25 166.75,185.25 160,178.5 160,169.5 169.75,159.75
NetC_r1_2 on HVDC "NETC_R1_2_L03_P143" (solid, pour order 143): 142.25,166.75 142.603,167.103 156.897,167.103 166.95,157.05 166.95,149.65 164.525,147.225 143.525,147.225 138,152.75 138,162.5

## Other copper
GND:
  pour cut-out: 181.5,116.038 181.013,116.525 166.9,116.525 166.9,116.5 165.5,115.1 165.5,101 168,98.5 178.52,98.5 181.5,101.48
  pour cut-out: 181.5,116.038 181.013,116.525 166.9,116.525 166.9,116.5 165.5,115.1 165.5,101 168,98.5 178.52,98.5 181.5,101.48
SIG:
  pour cut-out: 181.5,116.038 181.013,116.525 166.9,116.525 166.9,116.5 165.5,115.1 165.5,101 168,98.5 178.52,98.5 181.5,101.48

## Silkscreen, mask and mechanical layers (free items; w line width, h text height)
Top Overlay:
  drawing of 38 lines, arcs and shapes, not listed
  text "Designed By Karl Roque / Dec. 2025 Ver.01" at 39.509,195.369 h1 r270
  text "1kW CLLC / Primary Side" at 44.335,195.369 h1.5 r270